# Altium PCB ARU8113 Testboard_V0.1.PcbDoc (part 3 of 3)
Units mil, origin at the board's own origin, x right, y up, seen from the top; angles counter-clockwise.
Board outline 6377.95 x 5157.48 mil, 4 copper layers (Top, PWR, GND, Bottom), stack 62.992 mil thick; 518 components, 350 nets, 1764 pads, 749 vias.
Unrouted connection lines stored in the file: 230.
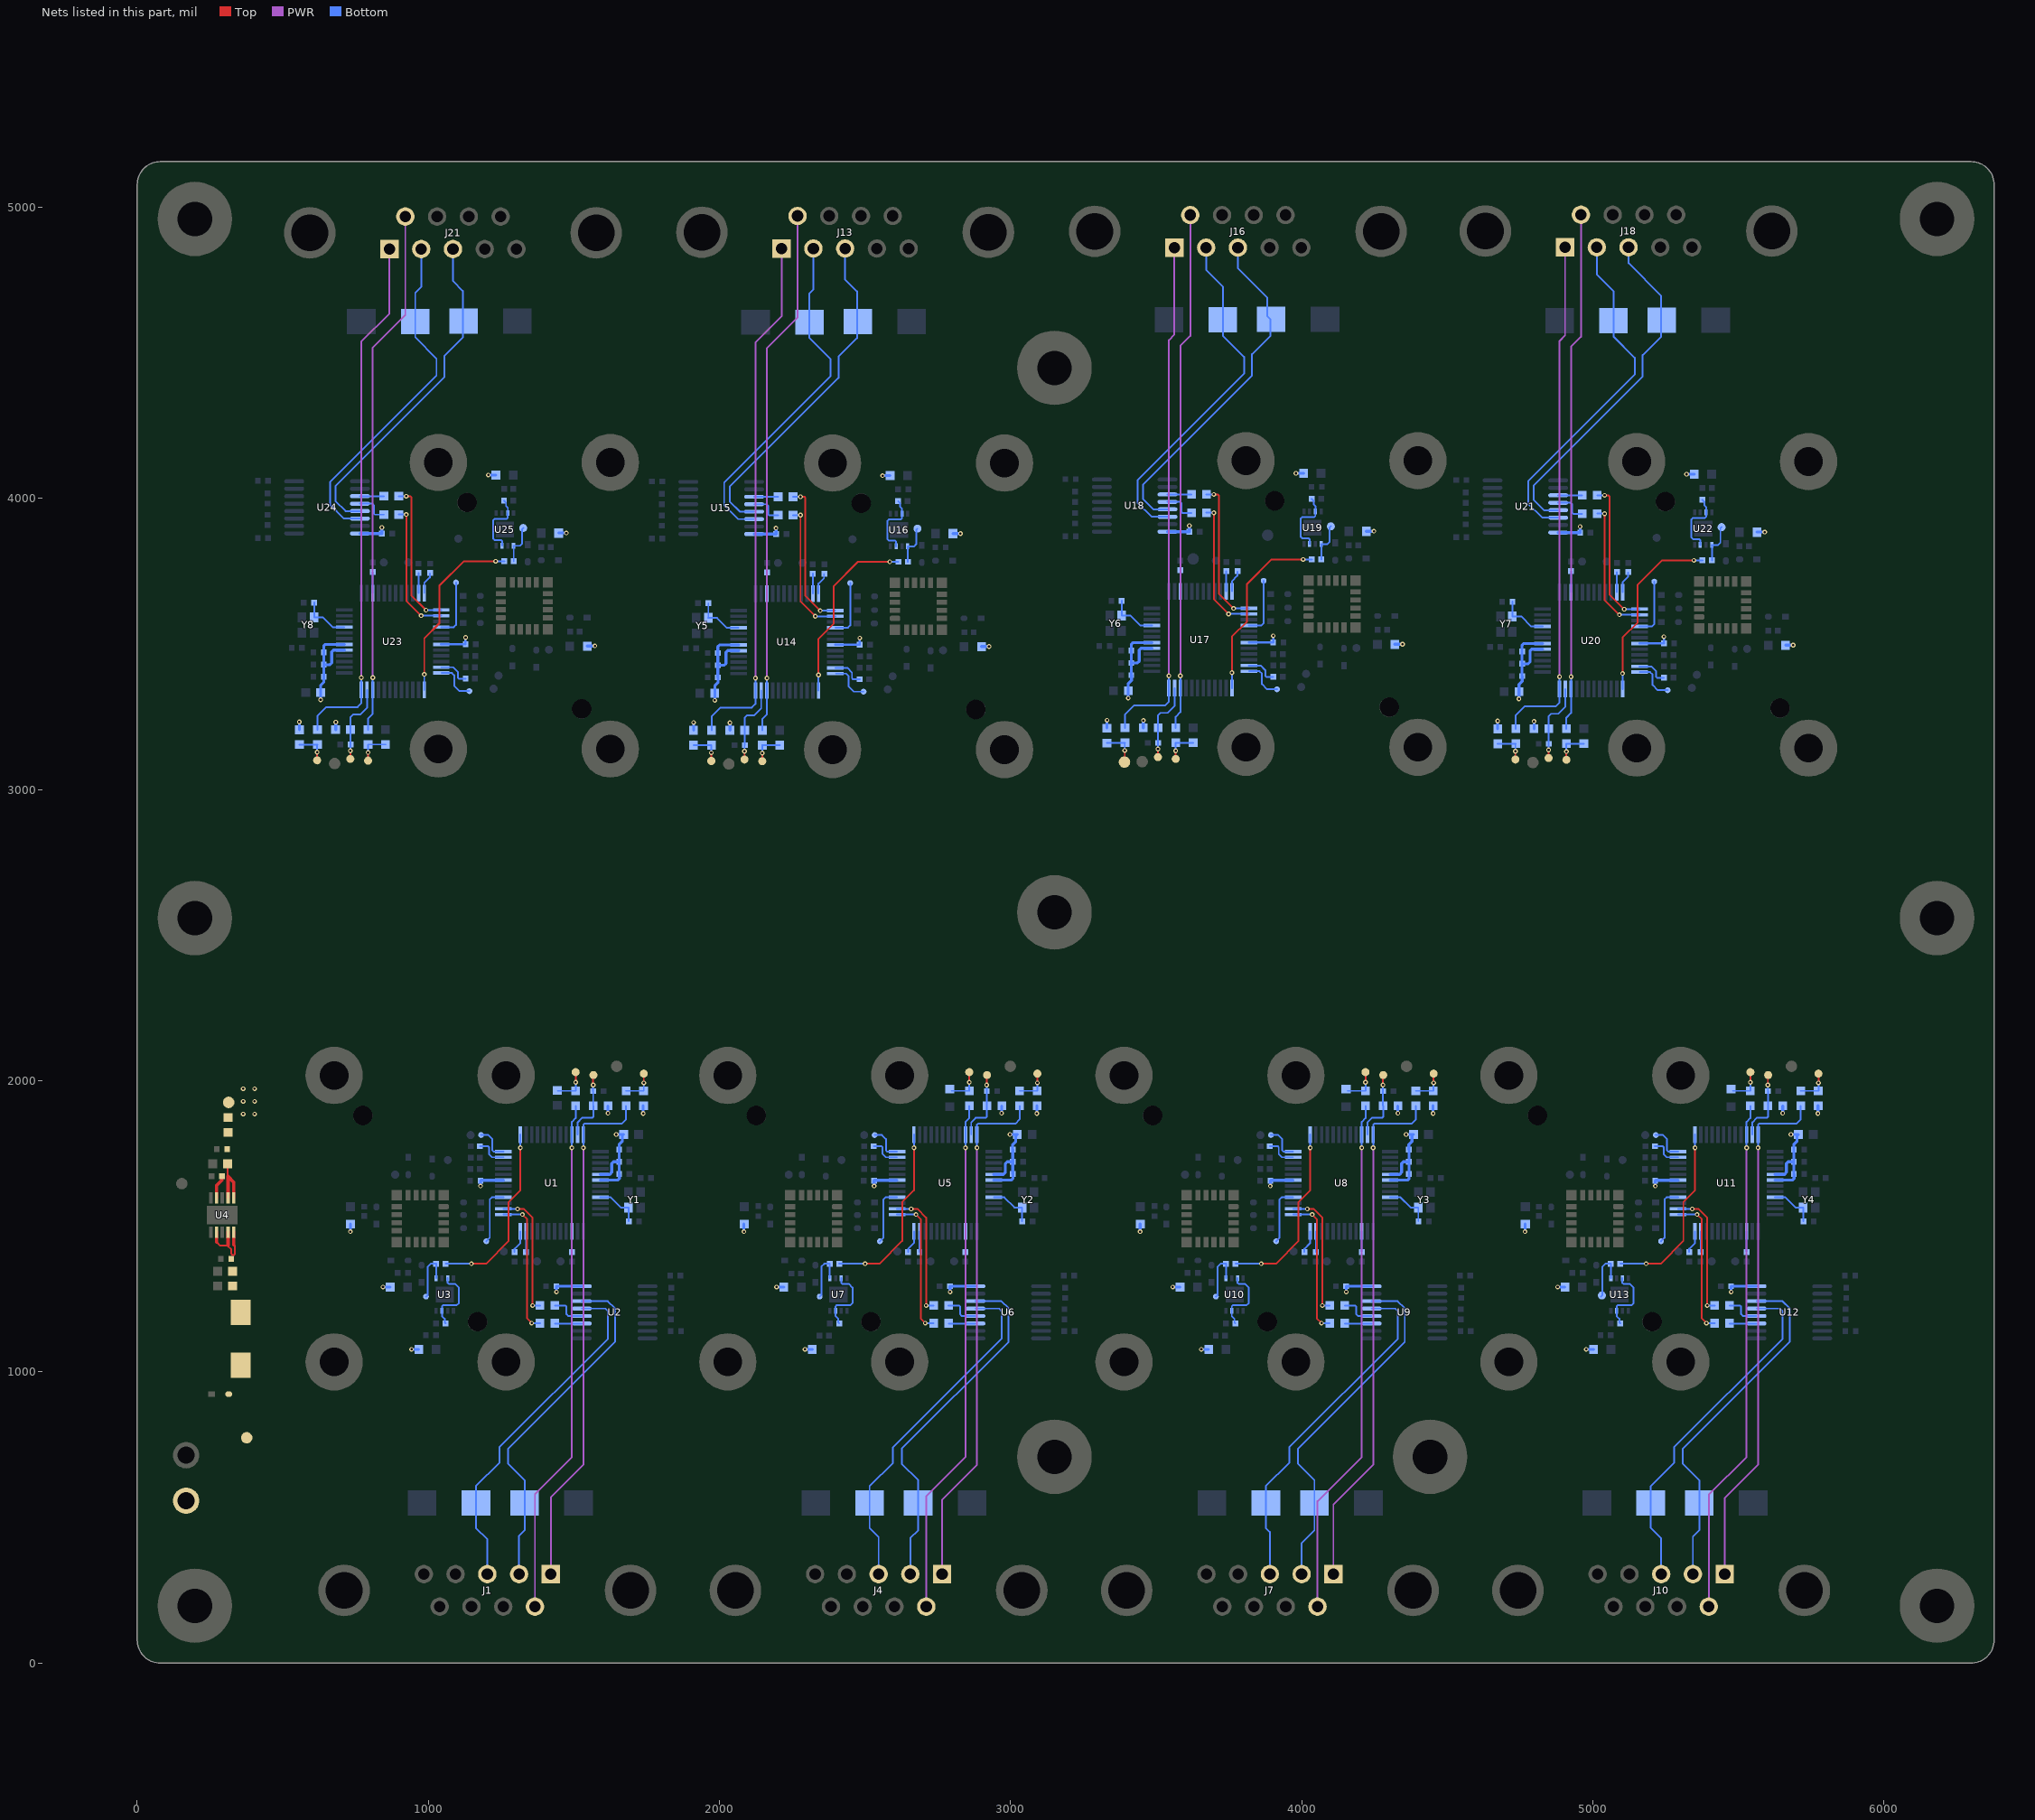
[diagram p5: the nets of this part, all layers, seen from the top]

## Via types
v1: diameter 16, hole 8, Top to Bottom, tented both sides, 749 vias

## Nets (pads, with @x,y where several pads share a name; then routed paths per layer and width w, separated by ;. In a path a pad name is that pad's centre, name@x,y a point inside that pad or via, vN(x,y) a via of type N, cw(c..) or ccw(c..) an arc to the next point about the centre after c; other vN are vias at no path point) (continued)
NetR1_1: J1.1 R1.1 U1.48 | length 1790.5
  PWR w6: J1.1@1420.65,304.91 1420.65,568.65 1532.39,680.39 v1(1532.39,1769)
  Bottom w6: v1(1532.39,1769) U1.48@1532.39,1814.44 1532.39,1848.49 1535.91,1852 1664,1852 1679,1867 R1.1@1679,1913.41
NetR2_1: J1.6 R2.1 U1.46 | length 1778.2
  PWR w6: J1.6@1366.13,193.1 1366.13,580.13 1493.02,707.02 v1(1493.02,1769)
  Bottom w6: v1(1493.02,1769) U1.46@1493.02,1814.44 1493.02,1858.02 1506,1871 R2.1@1506,1913.41
NetR15_2: R15.2 U2.11 | length 91.6
  Bottom w6: R15.2@1435.58,1165.6 U2.11@1527.2,1165.6
NetR16_2: R16.2 U2.12 | length 123
  Bottom w6: R16.2@1434.59,1227.59 1470.49,1227.59 1474,1224.08 1474,1198 1480.8,1191.2 U2.12@1527.2,1191.2
NetR19_1: J4.1 R19.1 U5.48 | length 1793.9
  PWR w6: J4.1@2764.65,304.91 2764.65,560.65 2884.39,680.39 v1(2884.39,1769)
  Bottom w6: v1(2884.39,1769) U5.48@2884.39,1814.44 2884.39,1848.49 2887.91,1852 3016,1852 3031,1867 R19.1@3031,1913.41
NetR20_1: J4.6 R20.1 U5.46 | length 1781.6
  PWR w6: J4.6@2710.13,193.1 2710.13,572.13 2845.02,707.02 v1(2845.02,1769)
  Bottom w6: v1(2845.02,1769) U5.46@2845.02,1814.44 2845.02,1858.02 2858,1871 R20.1@2858,1913.41
NetR33_2: R33.2 U6.11 | length 91.6
  Bottom w6: R33.2@2787.58,1165.6 U6.11@2879.2,1165.6
NetR34_2: R34.2 U6.12 | length 123
  Bottom w6: R34.2@2786.59,1227.59 2822.49,1227.59 2826,1224.08 2826,1198 2832.8,1191.2 U6.12@2879.2,1191.2
NetR36_1: J7.1 R36.1 U8.48 | length 1800.9
  PWR w6: J7.1@4108.65,304.91 4108.65,543.65 4245.39,680.39 v1(4245.39,1769)
  Bottom w6: v1(4245.39,1769) U8.48@4245.39,1814.44 4245.39,1848.49 4248.91,1852 4377,1852 4392,1867 R36.1@4392,1913.41
NetR37_1: J7.6 R37.1 U8.46 | length 1788.6
  PWR w6: J7.6@4054.13,193.1 4054.13,555.13 4206.02,707.02 v1(4206.02,1769)
  Bottom w6: v1(4206.02,1769) U8.46@4206.02,1814.44 4206.02,1858.02 4219,1871 R37.1@4219,1913.41
NetR50_2: R50.2 U9.11 | length 91.6
  Bottom w6: R50.2@4148.58,1165.6 U9.11@4240.2,1165.6
NetR51_2: R51.2 U9.12 | length 123
  Bottom w6: R51.2@4147.59,1227.59 4183.49,1227.59 4187,1224.08 4187,1198 4193.8,1191.2 U9.12@4240.2,1191.2
NetR53_1: J10.1 R53.1 U11.48 | length 1791.8
  PWR w6: J10.1@5452.65,304.91 5452.65,565.65 5567.39,680.39 v1(5567.39,1769)
  Bottom w6: v1(5567.39,1769) U11.48@5567.39,1814.44 5567.39,1848.49 5570.91,1852 5699,1852 5714,1867 R53.1@5714,1913.41
NetR54_1: J10.6 R54.1 U11.46 | length 1779.5
  PWR w6: J10.6@5398.13,193.1 5398.13,577.13 5528.02,707.02 v1(5528.02,1769)
  Bottom w6: v1(5528.02,1769) U11.46@5528.02,1814.44 5528.02,1858.02 5541,1871 R54.1@5541,1913.41
NetR67_2: R67.2 U12.11 | length 91.6
  Bottom w6: R67.2@5470.58,1165.6 U12.11@5562.2,1165.6
NetR68_2: R68.2 U12.12 | length 123
  Bottom w6: R68.2@5469.59,1227.59 5505.49,1227.59 5509,1224.08 5509,1198 5515.8,1191.2 U12.12@5562.2,1191.2
NetR70_1: J13.1 R70.1 U14.48 | length 1816.9
  PWR w6: v1(2123.61,3382.31) 2123.61,4535.58 2213.47,4625.44 J13.1@2213.47,4858.19
  Bottom w6: R70.1@1973.01,3203.59 1973.01,3250.01 2004,3281 2111,3281 2123.61,3293.61 U14.48@2123.61,3339.99 v1(2123.61,3382.31)
NetR71_1: J13.6 R71.1 U14.46 | length 1816.5
  PWR w6: v1(2162.98,3382.31) 2162.98,4515.98 2268,4621 J13.6@2268,4970
  Bottom w6: R71.1@2147,3203.59 2147,3241.8 2162.98,3257.77 U14.46@2162.98,3339.99 v1(2162.98,3382.31)
NetR84_2: R84.2 U15.11 | length 82.6
  Bottom w6: U15.11@2118.8,4005.4 R84.2@2201.41,4005.41
NetR85_2: R85.2 U15.12 | length 114.9
  Bottom w6: U15.12@2118.8,3979.8 2161.8,3979.8 2167,3974.6 2167,3945.51 2170.51,3942 R85.2@2201,3942
NetR87_1: J16.1 R87.1 U17.48 | length 1782.6
  PWR w6: v1(3543.61,3390.31) 3543.61,4543.58 3562.6,4562.57 J16.1@3562.6,4861.29
  Bottom w6: R87.1@3393.01,3211.59 3393.01,3258.01 3424,3289 3531,3289 3543.61,3301.61 U17.48@3543.61,3347.99 v1(3543.61,3390.31)
NetR88_1: J16.6 R88.1 U17.46 | length 1782.3
  PWR w6: v1(3582.98,3390.31) 3582.98,4523.98 3617.13,4558.13 J16.6@3617.13,4973.1
  Bottom w6: R88.1@3567,3211.59 3567,3249.8 3582.98,3265.77 U17.46@3582.98,3347.99 v1(3582.98,3390.31)
NetR101_2: R101.2 U18.11 | length 82.6
  Bottom w6: U18.11@3538.8,4013.4 R101.2@3621.41,4013.41
NetR102_2: R102.2 U18.12 | length 114.9
  Bottom w6: U18.12@3538.8,3987.8 3581.8,3987.8 3587,3982.6 3587,3953.51 3590.51,3950 R102.2@3621,3950
NetR104_1: J18.1 R104.1 U20.48 | length 1786.5
  PWR w6: v1(4885.61,3387.31) 4885.61,4540.58 4904.47,4559.44 J18.1@4904.47,4862.19
  Bottom w6: R104.1@4735.01,3208.59 4735.01,3255.01 4766,3286 4873,3286 4885.61,3298.61 U20.48@4885.61,3344.99 v1(4885.61,3387.31)
NetR105_1: J18.6 R105.1 U20.46 | length 1786.1
  PWR w6: v1(4924.98,3387.31) 4924.98,4520.98 4959,4555 J18.6@4959,4974
  Bottom w6: R105.1@4909,3208.59 4909,3246.8 4924.98,3262.77 U20.46@4924.98,3344.99 v1(4924.98,3387.31)
NetR118_2: R118.2 U21.11 | length 82.6
  Bottom w6: U21.11@4880.8,4010.4 R118.2@4963.41,4010.41
NetR119_2: R119.2 U21.12 | length 114.9
  Bottom w6: U21.12@4880.8,3984.8 4923.8,3984.8 4929,3979.6 4929,3950.51 4932.51,3947 R119.2@4963,3947
NetR121_1: J21.1 R121.1 U23.48 | length 1815.8
  PWR w6: v1(769.61,3384.31) 769.61,4537.58 866.47,4634.44 J21.1@866.47,4856.19
  Bottom w6: R121.1@619.01,3205.59 619.01,3252.01 650,3283 757,3283 769.61,3295.61 U23.48@769.61,3341.99 v1(769.61,3384.31)
NetR122_1: J21.6 R122.1 U23.46 | length 1815.4
  PWR w6: v1(808.98,3384.31) 808.98,4517.98 921,4630 J21.6@921,4968
  Bottom w6: R122.1@793,3205.59 793,3243.8 808.98,3259.77 U23.46@808.98,3341.99 v1(808.98,3384.31)
NetR135_2: R135.2 U24.11 | length 82.6
  Bottom w6: U24.11@764.8,4007.4 R135.2@847.41,4007.41
NetR136_2: R136.2 U24.12 | length 114.9
  Bottom w6: U24.12@764.8,3981.8 807.8,3981.8 813,3976.6 813,3947.51 816.51,3944 R136.2@847,3944
NetT42_1: T42.1 U11.28 | length 198.5
  Bottom w6: T42.1@5234,1448 5246,1460 5246,1591.78 5253.11,1598.89 U11.28@5292.79,1598.89
NetT90_1: T90.1 U23.28 | length 200
  Bottom w6: U23.28@1044.21,3557.54 1087.49,3557.54 1095.34,3565.39 T90.1@1095.34,3711
NetT135_1: T135.1 U1.36 | length 123.2
  Bottom w6: T135.1@1181,1813 1206,1813 1220,1799 1220,1759.88 1223.51,1756.37 U1.36@1257.79,1756.37
NetT136_1: T136.1 U5.36 | length 123.2
  Bottom w6: T136.1@2533,1813 2558,1813 2572,1799 2572,1759.88 2575.51,1756.37 U5.36@2609.79,1756.37
NetT137_1: T137.1 U8.36 | length 123.2
  Bottom w6: T137.1@3894,1813 3919,1813 3933,1799 3933,1759.88 3936.51,1756.37 U8.36@3970.79,1756.37
NetT138_1: T138.1 U11.36 | length 123.2
  Bottom w6: T138.1@5216,1813 5241,1813 5255,1799 5255,1759.88 5258.51,1756.37 U11.36@5292.79,1756.37
NetT139_1: T139.1 U14.36 | length 142.5
  Bottom w6: U14.36@2399.27,3398.06 2434.94,3398.06 2443,3390 2443,3354 2461,3336 T139.1@2495,3336
NetT140_1: T140.1 U17.36 | length 142.5
  Bottom w6: U17.36@3819.27,3406.06 3854.94,3406.06 3863,3398 3863,3362 3881,3344 T140.1@3915,3344
NetT141_1: T141.1 U20.36 | length 142.5
  Bottom w6: U20.36@5161.27,3403.06 5196.94,3403.06 5205,3395 5205,3359 5223,3341 T141.1@5257,3341
NetT142_1: T142.1 U23.36 | length 142.5
  Bottom w6: U23.36@1045.27,3400.06 1080.94,3400.06 1089,3392 1089,3356 1107,3338 T142.1@1141,3338
NMCU_RSTA1: C6.1 R4.2 T3.1 U1.47 | length 246.2
  Top w6: v1(1566,1985) T3.1@1566,2018
  Bottom w6: U1.47@1512.71,1814.44 1512.71,1856.71 1528,1872 1563.02,1872 1566.53,1875.51 R4.2@1566.53,1913.51 ; v1(1566,1985) 1566,1964.28 C6.1@1566.28,1964 R4.2@1566.28,1913.76
NMCU_RSTA2: C28.1 R22.2 T20.1 U5.47 | length 246.2
  Top w6: v1(2918,1985) T20.1@2918,2018
  Bottom w6: U5.47@2864.71,1814.44 2864.71,1856.71 2880,1872 2915.02,1872 2918.53,1875.51 R22.2@2918.53,1913.51 ; v1(2918,1985) 2918,1964.28 C28.1@2918.28,1964 R22.2@2918.28,1913.76
NMCU_RSTA3: C44.1 R39.2 T32.1 U8.47 | length 246.2
  Top w6: v1(4279,1985) T32.1@4279,2018
  Bottom w6: U8.47@4225.71,1814.44 4225.71,1856.71 4241,1872 4276.02,1872 4279.53,1875.51 R39.2@4279.53,1913.51 ; v1(4279,1985) 4279,1964.28 C44.1@4279.28,1964 R39.2@4279.28,1913.76
NMCU_RSTA4: C60.1 R56.2 T44.1 U11.47 | length 246.2
  Top w6: v1(5601,1985) T44.1@5601,2018
  Bottom w6: U11.47@5547.71,1814.44 5547.71,1856.71 5563,1872 5598.02,1872 5601.53,1875.51 R56.2@5601.53,1913.51 ; v1(5601,1985) 5601,1964.28 C60.1@5601.28,1964 R56.2@5601.28,1913.76
NMCU_RSTA5: C76.1 R73.2 T56.1 U14.47 | length 275
  Top w6: T56.1@2086,3103 v1(2086,3131)
  Bottom w6: v1(2086,3131) 2086,3151.41 C76.1@2086.59,3152 ; C76.1@2086.59,3152.41 R73.2@2086.59,3203.59 2086.59,3246.59 2095,3255 2120,3255 2143.29,3278.29 U14.47@2143.29,3339.99
NMCU_RSTA6: C92.1 R90.2 T68.1 U17.47 | length 275
  Top w6: T68.1@3506,3111 v1(3506,3139)
  Bottom w6: v1(3506,3139) 3506,3159.41 C92.1@3506.59,3160 ; C92.1@3506.59,3160.41 R90.2@3506.59,3211.59 3506.59,3254.59 3515,3263 3540,3263 3563.29,3286.29 U17.47@3563.29,3347.99
NMCU_RSTA7: C108.1 R107.2 T80.1 U20.47 | length 275
  Top w6: T80.1@4848,3108 v1(4848,3136)
  Bottom w6: v1(4848,3136) 4848,3156.41 C108.1@4848.59,3157 ; C108.1@4848.59,3157.41 R107.2@4848.59,3208.59 4848.59,3251.59 4857,3260 4882,3260 4905.29,3283.29 U20.47@4905.29,3344.99
NMCU_RSTA8: C124.1 R124.2 T92.1 U23.47 | length 275
  Top w6: T92.1@732,3105 v1(732,3133)
  Bottom w6: v1(732,3133) 732,3153.41 C124.1@732.59,3154 ; C124.1@732.59,3154.41 R124.2@732.59,3205.59 732.59,3248.59 741,3257 766,3257 789.29,3280.29 U23.47@789.29,3341.99
Server_RS232_RX1: D9.2 J1.3 U2.13 | length 1200.5
  Bottom w6: J1.3@1202.54,304.91 1202.54,424.46 1163.65,463.35 D9.2@1163.65,549.1 1163.65,606.65 1244,687 1244,740.71 1617,1113.71 1617,1208 1608.1,1216.9 U2.13@1527.2,1216.9
Server_RS232_RX3: D35.2 J7.3 U9.13 | length 1190.1
  Bottom w6: J7.3@3890.54,304.91 3890.54,449.46 3876.65,463.35 D35.2@3876.65,549.1 3876.65,606.65 3957,687 3957,740.71 4330,1113.71 4330,1208 4321.1,1216.9 U9.13@4240.2,1216.9
Server_RS232_RX4: D46.2 J10.3 U12.13 | length 1199.2
  Bottom w6: J10.3@5234.54,304.91 5234.54,427.46 5198.65,463.35 D46.2@5198.65,549.1 5198.65,606.65 5279,687 5279,740.71 5652,1113.71 5652,1208 5643.1,1216.9 U12.13@5562.2,1216.9
Server_RS232_RX5: D58.2 J13.3 U15.13 | length 1165.5
  Bottom w6: U15.13@2118.8,3954.2 2069.8,3954.2 2035,3989 2035,4040 2409,4414 2409,4487 2472.44,4550.44 2472.44,4607 2472.44,4710.56 2431.58,4751.42 J13.3@2431.58,4858.19
Server_RS232_RX6: D70.2 J16.3 U18.13 | length 1190
  Bottom w6: U18.13@3538.8,3962.2 3489.8,3962.2 3455,3997 3455,4048 3829,4422 3829,4495 3892.44,4558.44 3892.44,4615 3881.21,4626.23 3881.21,4689.79 3780.71,4790.29 J16.3@3780.71,4861.29
Server_RS232_RX7: D82.2 J18.3 U21.13 | length 1193.9
  Bottom w6: U21.13@4880.8,3959.2 4831.8,3959.2 4797,3994 4797,4045 5171,4419 5171,4492 5234.44,4555.44 5234.44,4612 5234.44,4695.56 5122.58,4807.42 J18.3@5122.58,4862.19
Server_RS232_RX8: D94.2 J21.3 U24.13 | length 1158.6
  Bottom w6: U24.13@764.8,3956.2 715.8,3956.2 681,3991 681,4042 1055,4416 1055,4489 1118.44,4552.44 1118.44,4609 1118.44,4712.56 1084.58,4746.42 J21.3@1084.58,4856.19
Server_RS232_RX_2: D23.2 J4.3 U6.13 | length 1197.2
  Bottom w6: J4.3@2546.54,304.91 2546.54,432.46 2515.65,463.35 D23.2@2515.65,549.1 2515.65,606.65 2596,687 2596,740.71 2969,1113.71 2969,1208 2960.1,1216.9 U6.13@2879.2,1216.9
Server_RS232_TX1: D8.2 J1.2 U2.14 | length 1220.2
  Bottom w6: J1.2@1311.6,304.91 1311.6,436.6 1330.61,455.61 D8.2@1330.61,549.1 1330.61,627.39 1274,684 1274,735.78 1640.82,1102.6 1640.82,1218.18 1616.5,1242.5 U2.14@1527.2,1242.5
Server_RS232_TX3: D34.2 J7.2 U9.14 | length 1230.6
  Bottom w6: J7.2@3999.6,304.91 3999.6,411.6 4043.61,455.61 D34.2@4043.61,549.1 4043.61,627.39 3987,684 3987,735.78 4353.82,1102.6 4353.82,1218.18 4329.5,1242.5 U9.14@4240.2,1242.5
Server_RS232_TX4: D45.2 J10.2 U12.14 | length 1221.5
  Bottom w6: J10.2@5343.6,304.91 5343.6,433.6 5365.61,455.61 D45.2@5365.61,549.1 5365.61,627.39 5309,684 5309,735.78 5675.82,1102.6 5675.82,1218.18 5651.5,1242.5 U12.14@5562.2,1242.5
Server_RS232_TX5: D57.2 J13.2 U15.14 | length 1191.5
  Bottom w6: U15.14@2118.8,3928.6 2064.4,3928.6 2016,3977 2016,4054 2382,4420 2382,4478 2308.93,4551.07 D57.2@2308.93,4605 2308.93,4703.93 2322.53,4717.53 J13.2@2322.53,4858.19
Server_RS232_TX6: D69.2 J16.2 U18.14 | length 1204.7
  Bottom w6: U18.14@3538.8,3936.6 3484.4,3936.6 3436,3985 3436,4062 3802,4428 3802,4486 3728.93,4559.07 D69.2@3728.93,4613 3728.93,4727.54 3671.65,4784.81 J16.2@3671.65,4861.29
Server_RS232_TX7: D81.2 J18.2 U21.14 | length 1208.7
  Bottom w6: U21.14@4880.8,3933.6 4826.4,3933.6 4778,3982 4778,4059 5144,4425 5144,4483 5070.93,4556.07 D81.2@5070.93,4610 5070.93,4712.07 5013.53,4769.47 J18.2@5013.53,4862.19
Server_RS232_TX8: D93.2 J21.2 U24.14 | length 1190.4
  Bottom w6: U24.14@764.8,3930.6 710.4,3930.6 662,3979 662,4056 1028,4422 1028,4480 954.93,4553.07 954.93,4705.93 975.53,4726.53 J21.2@975.53,4856.19
Server_RS232_TX_2: D22.2 J4.2 U6.14 | length 1223.5
  Bottom w6: J4.2@2655.6,304.91 2655.6,428.6 2682.61,455.61 D22.2@2682.61,549.1 2682.61,627.39 2626,684 2626,735.78 2992.82,1102.6 2992.82,1218.18 2968.5,1242.5 U6.14@2879.2,1242.5
Server_RXD1: R16.1 U1.26 | length 440
  Top w6: v1(1306.27,1559.13) 1327.92,1559.13 1357.82,1529.22 v1(1357.82,1227.59)
  Bottom w6: U1.26@1257.79,1559.52 1258.18,1559.13 1305.87,1559.13 v1@1306.27,1558.73 ; v1(1357.82,1227.59) R16.1@1383.41,1227.59
Server_RXD2: R34.1 U5.26 | length 440
  Top w6: v1(2658.27,1559.13) 2679.92,1559.13 2709.82,1529.22 v1(2709.82,1227.59)
  Bottom w6: U5.26@2609.79,1559.52 2610.18,1559.13 2657.87,1559.13 v1@2658.27,1558.73 ; v1(2709.82,1227.59) R34.1@2735.41,1227.59
Server_RXD3: R51.1 U8.26 | length 440
  Top w6: v1(4019.27,1559.13) 4040.92,1559.13 4070.82,1529.22 v1(4070.82,1227.59)
  Bottom w6: U8.26@3970.79,1559.52 3971.18,1559.13 4018.87,1559.13 v1@4019.27,1558.73 ; v1(4070.82,1227.59) R51.1@4096.41,1227.59
Server_RXD4: R68.1 U11.26 | length 440
  Top w6: v1(5341.27,1559.13) 5362.92,1559.13 5392.82,1529.22 v1(5392.82,1227.59)
  Bottom w6: U11.26@5292.79,1559.52 5293.18,1559.13 5340.87,1559.13 v1@5341.27,1558.73 ; v1(5392.82,1227.59) R68.1@5418.41,1227.59
Server_RXD5: R85.1 U14.26 | length 463.2
  Top w6: v1(2278.18,3942.41) 2278.18,3645.82 v1(2329,3595)
  Bottom w6: R85.1@2252.59,3942.41 v1(2278.18,3942.41) ; v1(2329,3595) U14.26@2398.17,3594.96
Server_RXD6: R102.1 U17.26 | length 463.2
  Top w6: v1(3698.18,3950.41) 3698.18,3653.82 v1(3749,3603)
  Bottom w6: R102.1@3672.59,3950.41 v1(3698.18,3950.41) ; v1(3749,3603) U17.26@3818.17,3602.96
Server_RXD7: R119.1 U20.26 | length 463.2
  Top w6: v1(5040.18,3947.41) 5040.18,3650.82 v1(5091,3600)
  Bottom w6: R119.1@5014.59,3947.41 v1(5040.18,3947.41) ; v1(5091,3600) U20.26@5160.17,3599.96
Server_RXD8: R136.1 U23.26 | length 463.2
  Top w6: v1(924.18,3944.41) 924.18,3647.82 v1(975,3597)
  Bottom w6: R136.1@898.59,3944.41 v1(924.18,3944.41) ; v1(975,3597) U23.26@1044.17,3596.96
Server_TXD1: R15.1 U1.25 | length 479.9
  Top w6: v1(1323,1540) 1339,1524 1339,1183 v1(1355,1167)
  Bottom w6: U1.25@1257.79,1539.83 1257.87,1539.92 1322.92,1539.92 v1(1323,1540) ; v1(1355,1167) R15.1@1383.41,1167
Server_TXD2: R33.1 U5.25 | length 479.9
  Top w6: v1(2675,1540) 2691,1524 2691,1183 v1(2707,1167)
  Bottom w6: U5.25@2609.79,1539.83 2609.87,1539.92 2674.92,1539.92 v1(2675,1540) ; v1(2707,1167) R33.1@2735.41,1167
Server_TXD3: R50.1 U8.25 | length 479.9
  Top w6: v1(4036,1540) 4052,1524 4052,1183 v1(4068,1167)
  Bottom w6: U8.25@3970.79,1539.83 3970.87,1539.92 4035.92,1539.92 v1(4036,1540) ; v1(4068,1167) R50.1@4096.41,1167
Server_TXD4: R67.1 U11.25 | length 479.9
  Top w6: v1(5358,1540) 5374,1524 5374,1183 v1(5390,1167)
  Bottom w6: U11.25@5292.79,1539.83 5292.87,1539.92 5357.92,1539.92 v1(5358,1540) ; v1(5390,1167) R67.1@5418.41,1167
Server_TXD5: R84.1 U14.25 | length 504.6
  Top w6: v1(2278.18,4005.41) 2291.67,4005.41 2295.18,4001.9 2295.18,3664.82 v1(2346,3614)
  Bottom w6: R84.1@2252.59,4005.41 v1(2278.18,4005.41) ; v1(2346,3614) U14.25@2397.61,3614
Server_TXD6: R101.1 U17.25 | length 504.6
  Top w6: v1(3698.18,4013.41) 3711.67,4013.41 3715.18,4009.9 3715.18,3672.82 v1(3766,3622)
  Bottom w6: R101.1@3672.59,4013.41 v1(3698.18,4013.41) ; v1(3766,3622) U17.25@3817.61,3622
Server_TXD7: R118.1 U20.25 | length 504.6
  Top w6: v1(5040.18,4010.41) 5053.67,4010.41 5057.18,4006.9 5057.18,3669.82 v1(5108,3619)
  Bottom w6: R118.1@5014.59,4010.41 v1(5040.18,4010.41) ; v1(5108,3619) U20.25@5159.61,3619
Server_TXD8: R135.1 U23.25 | length 504.6
  Top w6: v1(924.18,4007.41) 937.67,4007.41 941.18,4003.9 941.18,3666.82 v1(992,3616)
  Bottom w6: R135.1@898.59,4007.41 v1(924.18,4007.41) ; v1(992,3616) U23.25@1043.61,3616
SPI_CS3_1: R14.2 T12.1 U3.1 | length 187.8
  Bottom w6: T12.1@992,1258 997.91,1263.91 997.91,1360.71 1008.2,1371 R14.2@1026.86,1371 U3.1@1026.86,1321.54
SPI_CS3_2: R32.2 T29.1 U7.1 | length 187.8
  Bottom w6: T29.1@2344,1258 2349.91,1263.91 2349.91,1360.71 2360.2,1371 R32.2@2378.86,1371 U7.1@2378.86,1321.54
SPI_CS3_3: R49.2 T41.1 U10.1 | length 187.8
  Bottom w6: T41.1@3705,1258 3710.91,1263.91 3710.91,1360.71 3721.2,1371 R49.2@3739.86,1371 U10.1@3739.86,1321.54
SPI_CS3_4: R66.2 T53.1 U13.1 | length 187.8
  Bottom w6: T53.1@5027,1258 5032.91,1263.91 5032.91,1360.71 5043.2,1371 R66.2@5061.86,1371 U13.1@5061.86,1321.54
SPI_CS3_5: R83.2 T65.1 U16.1 | length 140.9
  Bottom w6: U16.1@2646.4,3835 U16.1@2647.14,3835 ; R83.2@2647.14,3782 U16.1@2647.14,3835 ; T65.1@2680,3896 2676.16,3892.16 2676.16,3842.63 2668.53,3835 U16.1@2647.14,3835
SPI_CS3_6: R100.2 T77.1 U19.1 | length 140.9
  Bottom w6: U19.1@4066.4,3843 U19.1@4067.14,3843 ; R100.2@4067.14,3790 U19.1@4067.14,3843 ; T77.1@4100,3904 4096.16,3900.16 4096.16,3850.63 4088.53,3843 U19.1@4067.14,3843
SPI_CS3_7: R117.2 T89.1 U22.1 | length 140.9
  Bottom w6: U22.1@5408.4,3840 U22.1@5409.14,3840 ; R117.2@5409.14,3787 U22.1@5409.14,3840 ; T89.1@5442,3901 5438.16,3897.16 5438.16,3847.63 5430.53,3840 U22.1@5409.14,3840
SPI_CS3_8: R134.2 T101.1 U25.1 | length 140.9
  Bottom w6: U25.1@1292.4,3837 U25.1@1293.14,3837 ; R134.2@1293.14,3784 U25.1@1293.14,3837 ; T101.1@1326,3898 1322.16,3894.16 1322.16,3844.63 1314.53,3837 U25.1@1293.14,3837
SPIA_CS1_IMU1: R12.1 U1.35 | length 109.5
  Bottom w6: R12.1@1177.58,1774.65 1204.49,1774.65 1208,1771.14 1208,1748 1219.31,1736.69 U1.35@1257.79,1736.69
SPIA_CS1_IMU2: R30.1 U5.35 | length 109.5
  Bottom w6: R30.1@2529.58,1774.65 2556.49,1774.65 2560,1771.14 2560,1748 2571.31,1736.69 U5.35@2609.79,1736.69
SPIA_CS1_IMU3: R47.1 U8.35 | length 109.5
  Bottom w6: R47.1@3890.58,1774.65 3917.49,1774.65 3921,1771.14 3921,1748 3932.31,1736.69 U8.35@3970.79,1736.69
SPIA_CS1_IMU4: R64.1 U11.35 | length 109.5
  Bottom w6: R64.1@5212.58,1774.65 5239.49,1774.65 5243,1771.14 5243,1748 5254.31,1736.69 U11.35@5292.79,1736.69
SPIA_CS1_IMU5: R81.1 U14.35 | length 111.4
  Bottom w6: U14.35@2398.21,3417.75 2438.93,3417.75 2455,3401.68 2455,3382.17 2458.51,3378.65 R81.1@2482,3378.65
SPIA_CS1_IMU6: R98.1 U17.35 | length 111.4
  Bottom w6: U17.35@3818.21,3425.75 3858.93,3425.75 3875,3409.68 3875,3390.17 3878.51,3386.65 R98.1@3902,3386.65
SPIA_CS1_IMU7: R115.1 U20.35 | length 111.4
  Bottom w6: U20.35@5160.21,3422.75 5200.93,3422.75 5217,3406.68 5217,3387.17 5220.51,3383.65 R115.1@5244,3383.65
SPIA_CS1_IMU8: R132.1 U23.35 | length 111.4
  Bottom w6: U23.35@1044.21,3419.75 1084.93,3419.75 1101,3403.68 1101,3384.17 1104.51,3380.65 R132.1@1128,3380.65
SPIA_CS3_IMU1: R14.1 U1.37 | length 631.2
  Top w6: v1(1148,1371) 1198,1371 1276,1449 1276,1583.13 1316,1623.13 v1(1316,1769)
  Bottom w6: R14.1@1059.14,1371 v1(1148,1371) ; U1.37@1315.86,1814.44 1316,1814.3 v1(1316,1769)
SPIA_CS3_IMU2: R32.1 U5.37 | length 631.2
  Top w6: v1(2500,1371) 2550,1371 2628,1449 2628,1583.13 2668,1623.13 v1(2668,1769)
  Bottom w6: R32.1@2411.14,1371 v1(2500,1371) ; U5.37@2667.86,1814.44 2668,1814.3 v1(2668,1769)
SPIA_CS3_IMU3: R49.1 U8.37 | length 631.2
  Top w6: v1(3861,1371) 3911,1371 3989,1449 3989,1583.13 4029,1623.13 v1(4029,1769)
  Bottom w6: R49.1@3772.14,1371 v1(3861,1371) ; U8.37@4028.86,1814.44 4029,1814.3 v1(4029,1769)
SPIA_CS3_IMU4: R66.1 U11.37 | length 631.2
  Top w6: v1(5183,1371) 5233,1371 5311,1449 5311,1583.13 5351,1623.13 v1(5351,1769)
  Bottom w6: R66.1@5094.14,1371 v1(5183,1371) ; U11.37@5350.86,1814.44 5351,1814.3 v1(5351,1769)
SPIA_CS3_IMU5: R83.1 U14.37 | length 637.1
  Top w6: v1(2340.14,3393.3) 2340.14,3517.16 2392,3569.01 2392,3698 2476,3782 v1(2585,3782)
  Bottom w6: U14.37@2340.14,3339.99 v1(2340.14,3393.3) ; v1(2585,3782) R83.1@2614.86,3782
SPIA_CS3_IMU6: R100.1 U17.37 | length 637.1
  Top w6: v1(3760.14,3401.3) 3760.14,3525.16 3812,3577.01 3812,3706 3896,3790 v1(4005,3790)
  Bottom w6: U17.37@3760.14,3347.99 v1(3760.14,3401.3) ; v1(4005,3790) R100.1@4034.86,3790
SPIA_CS3_IMU7: R117.1 U20.37 | length 637.1
  Top w6: v1(5102.14,3398.3) 5102.14,3522.16 5154,3574.01 5154,3703 5238,3787 v1(5347,3787)
  Bottom w6: U20.37@5102.14,3344.99 v1(5102.14,3398.3) ; v1(5347,3787) R117.1@5376.86,3787
SPIA_CS3_IMU8: R134.1 U23.37 | length 637.1
  Top w6: v1(986.14,3395.3) 986.14,3519.16 1038,3571.01 1038,3700 1122,3784 v1(1231,3784)
  Bottom w6: U23.37@986.14,3341.99 v1(986.14,3395.3) ; v1(1231,3784) R134.1@1260.86,3784
SPIA_DIN_IMU1: R10.1 U1.15 | length 70.8
  Bottom w6: R10.1@1493,1411 U1.15@1493.02,1481.76
SPIA_DIN_IMU2: R28.1 U5.15 | length 70.8
  Bottom w6: R28.1@2845,1411 U5.15@2845.02,1481.76
SPIA_DIN_IMU3: R45.1 U8.15 | length 70.8
  Bottom w6: R45.1@4206,1411 U8.15@4206.02,1481.76
SPIA_DIN_IMU4: R62.1 U11.15 | length 70.8
  Bottom w6: R62.1@5528,1411 U11.15@5528.02,1481.76
SPIA_DIN_IMU5: R79.1 U14.15 | length 72.8
  Bottom w6: U14.15@2162.98,3672.67 R79.1@2163,3745.51
SPIA_DIN_IMU6: R96.1 U17.15 | length 72.8
  Bottom w6: U17.15@3582.98,3680.67 R96.1@3583,3753.51
SPIA_DIN_IMU7: R113.1 U20.15 | length 72.8
  Bottom w6: U20.15@4924.98,3677.67 R113.1@4925,3750.51
SPIA_DIN_IMU8: R130.1 U23.15 | length 72.8
  Bottom w6: U23.15@808.98,3674.67 R130.1@809,3747.51
SPIA_DOUT_IMU1: R11.1 U1.23 | length 70.8
  Bottom w6: R11.1@1335.54,1411 U1.23@1335.54,1481.76
SPIA_DOUT_IMU2: R29.1 U5.23 | length 70.8
  Bottom w6: R29.1@2687.54,1411 U5.23@2687.54,1481.76
SPIA_DOUT_IMU3: R46.1 U8.23 | length 70.8
  Bottom w6: R46.1@4048.54,1411 U8.23@4048.54,1481.76
SPIA_DOUT_IMU4: R63.1 U11.23 | length 70.8
  Bottom w6: R63.1@5370.54,1411 U11.23@5370.54,1481.76
SPIA_DOUT_IMU5: R80.1 U14.23 | length 68.8
  Bottom w6: U14.23@2320.46,3672.67 R80.1@2320.45,3741.51
SPIA_DOUT_IMU6: R97.1 U17.23 | length 68.8
  Bottom w6: U17.23@3740.46,3680.67 R97.1@3740.45,3749.51
SPIA_DOUT_IMU7: R114.1 U20.23 | length 68.8
  Bottom w6: U20.23@5082.46,3677.67 R114.1@5082.45,3746.51
SPIA_DOUT_IMU8: R131.1 U23.23 | length 68.8
  Bottom w6: U23.23@966.46,3674.67 R131.1@966.45,3743.51
SPIA_SCK_IMU1: R9.1 U1.24 | length 79
  Bottom w6: R9.1@1296,1411 1296,1422.36 1315.86,1442.21 U1.24@1315.86,1481.76
SPIA_SCK_IMU2: R27.1 U5.24 | length 79
  Bottom w6: R27.1@2648,1411 2648,1422.36 2667.86,1442.21 U5.24@2667.86,1481.76
SPIA_SCK_IMU3: R44.1 U8.24 | length 79
  Bottom w6: R44.1@4009,1411 4009,1422.36 4028.86,1442.21 U8.24@4028.86,1481.76
SPIA_SCK_IMU4: R61.1 U11.24 | length 79
  Bottom w6: R61.1@5331,1411 5331,1422.36 5350.86,1442.21 U11.24@5350.86,1481.76
SPIA_SCK_IMU5: R78.1 U14.24 | length 75.2
  Bottom w6: U14.24@2340.14,3672.67 2340.14,3707.14 2358.99,3725.99 R78.1@2358.99,3740.05
SPIA_SCK_IMU6: R95.1 U17.24 | length 75.2
  Bottom w6: U17.24@3760.14,3680.67 3760.14,3715.14 3778.99,3733.99 R95.1@3778.99,3748.05
SPIA_SCK_IMU7: R112.1 U20.24 | length 75.2
  Bottom w6: U20.24@5102.14,3677.67 5102.14,3712.14 5120.99,3730.99 R112.1@5120.99,3745.05
SPIA_SCK_IMU8: R129.1 U23.24 | length 75.2
  Bottom w6: U23.24@986.14,3674.67 986.14,3709.14 1004.99,3727.99 R129.1@1004.99,3742.05
SWD_CLKA1: R2.2 R7.2 T7.1 | length 125.4
  Top w6: v1(1506,1994) T7.1@1506,2029
  Bottom w6: R7.2@1445,1964.59 R2.2@1506,1964.59 v1(1506,1994)
SWD_CLKA2: R20.2 R26.2 T24.1 | length 125.4
  Top w6: v1(2858,1994) T24.1@2858,2029
  Bottom w6: R26.2@2797,1964.59 R20.2@2858,1964.59 v1(2858,1994)
SWD_CLKA3: R37.2 R43.2 T36.1 | length 125.4
  Top w6: v1(4219,1994) T36.1@4219,2029
  Bottom w6: R43.2@4158,1964.59 R37.2@4219,1964.59 v1(4219,1994)
SWD_CLKA4: R54.2 R60.2 T48.1 | length 125.4
  Top w6: v1(5541,1994) T48.1@5541,2029
  Bottom w6: R60.2@5480,1964.59 R54.2@5541,1964.59 v1(5541,1994)
SWD_CLKA5: R71.2 R77.2 T60.1 | length 115.4
  Top w6: T60.1@2147,3097 v1(2147,3125)
  Bottom w6: v1(2147,3125) R71.2@2147,3152.41 ; R71.2@2147,3152.41 R77.2@2207.01,3152.41
SWD_CLKA6: R88.2 R94.2 T72.1 | length 115.4
  Top w6: T72.1@3567,3105 v1(3567,3133)
  Bottom w6: v1(3567,3133) R88.2@3567,3160.41 ; R88.2@3567,3160.41 R94.2@3627.01,3160.41
SWD_CLKA7: R105.2 R111.2 T84.1 | length 115.4
  Top w6: T84.1@4909,3102 v1(4909,3130)
  Bottom w6: v1(4909,3130) R105.2@4909,3157.41 ; R105.2@4909,3157.41 R111.2@4969.01,3157.41
SWD_CLKA8: R122.2 R128.2 T96.1 | length 115.4
  Top w6: T96.1@793,3099 v1(793,3127)
  Bottom w6: v1(793,3127) R122.2@793,3154.41 ; R122.2@793,3154.41 R128.2@853.01,3154.41
SWD_DIOA1: R1.2 R5.2 T4.1 | length 119.8
  Top w6: v1(1740,1992) T4.1@1740,2024
  Bottom w6: R1.2@1679,1964.59 R5.2@1739,1964.59 1740,1965.59 v1(1740,1992)
SWD_DIOA2: R19.2 R23.2 T21.1 | length 119.8
  Top w6: v1(3092,1992) T21.1@3092,2024
  Bottom w6: R19.2@3031,1964.59 R23.2@3091,1964.59 3092,1965.59 v1(3092,1992)
SWD_DIOA3: R36.2 R40.2 T33.1 | length 119.8
  Top w6: v1(4453,1992) T33.1@4453,2024
  Bottom w6: R36.2@4392,1964.59 R40.2@4452,1964.59 4453,1965.59 v1(4453,1992)
SWD_DIOA4: R53.2 R58.2 T45.1 | length 119.8
  Top w6: v1(5775,1992) T45.1@5775,2024
  Bottom w6: R53.2@5714,1964.59 R58.2@5774,1964.59 5775,1965.59 v1(5775,1992)
SWD_DIOA5: R70.2 R74.2 T57.1 | length 115
  Top w6: T57.1@1972,3098 v1(1972,3126)
  Bottom w6: R74.2@1911.01,3152 R70.2@1972.6,3152 ; v1(1972,3126) R70.2@1972,3151.4
SWD_DIOA6: R87.2 R92.2 T69.1 | length 127.4
  Top w6: T69.1@3391,3094 3392,3095 v1(3392,3134)
  Bottom w6: R92.2@3331.01,3160 R87.2@3392.6,3160 ; v1(3392,3134) R87.2@3392,3159.4
SWD_DIOA7: R104.2 R108.2 T81.1 | length 115
  Top w6: T81.1@4734,3103 v1(4734,3131)
  Bottom w6: R108.2@4673.01,3157 R104.2@4734.6,3157 ; v1(4734,3131) R104.2@4734,3156.4
SWD_DIOA8: R121.2 R125.2 T93.1 | length 115
  Top w6: T93.1@618,3100 v1(618,3128)
  Bottom w6: R125.2@557.01,3154 R121.2@618.6,3154 ; v1(618,3128) R121.2@618,3153.4
SYNC1: T1.1 U1.28 | length 198.5
  Bottom w6: T1.1@1199,1448 1211,1460 1211,1591.78 1218.11,1598.89 U1.28@1257.79,1598.89
SYNC2: T18.1 U5.28 | length 198.5
  Bottom w6: T18.1@2551,1448 2563,1460 2563,1591.78 2570.11,1598.89 U5.28@2609.79,1598.89
SYNC3: T30.1 U8.28 | length 198.5
  Bottom w6: T30.1@3912,1448 3924,1460 3924,1591.78 3931.11,1598.89 U8.28@3970.79,1598.89
SYNC5: T54.1 U14.28 | length 200
  Bottom w6: U14.28@2398.21,3555.54 2441.49,3555.54 2449.34,3563.39 T54.1@2449.34,3709
SYNC6: T66.1 U17.28 | length 200
  Bottom w6: U17.28@3818.21,3563.54 3861.49,3563.54 3869.34,3571.39 T66.1@3869.34,3717
SYNC7: T78.1 U20.28 | length 200
  Bottom w6: U20.28@5160.21,3560.54 5203.49,3560.54 5211.34,3568.39 T78.1@5211.34,3714
VCC3V3: C1.1 C2.2 C3.1 C4.1 C5.1 C11.1 C23.1 C24.2 C25.1 C26.1 C27.1 C33.1 C39.1 C40.2 C41.1 C42.1 C43.1 C49.1 C55.1 C56.2 C57.1 C58.1 C59.1 C65.1 C71.1 C72.2 C73.1 C74.1 C75.1 C81.1 C87.1 C88.2 C89.1 C90.1 C91.1 C97.1 C103.1 C104.2 C105.1 C106.1 C107.1 C113.1 C119.1 C120.2 C121.1 C122.1 C123.1 C129.1 L1.2 L2.1 L3.1 L4.2 L5.1 L6.1 L7.2 L8.1 L9.1 L10.2 L11.1 L12.1 L13.1 L14.2 L15.1 L16.1 L17.2 L18.1 L19.1 L20.2 L21.1 L22.1 L23.2 L24.1 R4.1 R5.1 R18.1 R22.1 R23.1 R39.1 R40.1 R56.1 R58.1 R73.1 R74.1 R90.1 R92.1 R107.1 R108.1 R124.1 R125.1 T14.1 U1.5 U1.6 U1.31 U2.16 U5.5 U5.6 U5.31 U6.16 U8.5 U8.6 U8.31 U9.16 U11.5 U11.6 U11.31 U12.16 U14.5 U14.6 U14.31 U15.16 U17.5 U17.6 U17.31 U18.16 U20.5 U20.6 U20.31 U21.16 U23.5 U23.6 U23.31 U24.16 | length 5553
  Bottom w7.87: U23.31@1044.21,3498.74 C123.1@1127.61,3498.74 ; C123.1@1127.93,3499.06 v1@1127.93,3521.93 ; C11.1@1439.92,1293.8 U2.16@1527.2,1293.8 ; U14.31@2398.21,3496.74 C75.1@2481.61,3496.74 ; C75.1@2481.93,3497.06 v1@2481.93,3519.93 ; C33.1@2791.92,1293.8 U6.16@2879.2,1293.8 ; U17.31@3818.21,3504.74 C91.1@3901.61,3504.74 ; C91.1@3901.93,3505.06 v1@3901.93,3527.93 ; C49.1@4152.92,1293.8 U9.16@4240.2,1293.8 ; U20.31@5160.21,3501.74 C107.1@5243.61,3501.74 ; C107.1@5243.93,3502.06 v1@5243.93,3524.93 ; C65.1@5474.92,1293.8 U12.16@5562.2,1293.8
  Bottom w10: R125.1@557.01,3205.18 v1(557,3232) ; v1(630,3308) 630,3357.71 641,3368.71 C120.2@641,3386.43 ; C120.2@640.71,3386.72 C121.1@640.72,3428.71 ; R124.1@682,3205.59 v1(682,3231.18) ; U23.5@711.54,3479 674,3479 668,3473 668,3434.57 662.14,3428.71 C121.1@640.72,3428.71 ; U23.6@711.54,3498.49 646.57,3498.49 640.72,3492.63 C122.1@640.72,3470.71 C121.1@640.72,3428.71 ; v1(732,1481) L3.1@732,1506.85 ; U24.16@765,3879.2 C129.1@840.28,3879.2 ; C129.1@840.14,3878.86 v1@840.14,3899.57 ; v1(844,1291) L2.1@869.08,1291 ; v1(942,1077) L1.2@967.08,1077 ; v1@1179.17,1637.95 C5.1@1179.17,1655.64 ; C5.1@1180.87,1657.37 U1.31@1257.22,1657.37 ; v1(1206,4080) L23.2@1232.08,4080 ; v1@1439.86,1274.14 C11.1@1439.86,1293.86 ; L22.1@1447.97,3881 v1(1474,3881) ; L24.1@1545.92,3493 v1(1572,3493) ; U1.6@1590.46,1657.94 1650.14,1657.94 1656,1663.8 C4.1@1656,1678.28 ; U1.5@1590.46,1678 1623.14,1678 1630.01,1684.87 1630.01,1715.14 1635.87,1721 C3.1@1655.28,1721 ; v1(1617,1887.92) R4.1@1617,1912.8 ; v1(1645.41,1815) C1.1@1671,1815 1665.86,1809.86 1665.86,1790.86 1655,1780 C2.2@1655,1763.28 ; C4.1@1655.28,1679 C3.1@1655.28,1721 ; C2.2@1655.29,1763 C3.1@1655.28,1721 ; v1(1738,1887) R5.1@1738,1913.41 ; R74.1@1911.01,3203.18 v1(1911,3230) ; v1(1984,3306) 1984,3355.71 1995,3366.71 C72.2@1995,3384.43 ; C72.2@1994.71,3384.72 C73.1@1994.72,3426.71 ; R73.1@2036,3203.59 v1(2036,3229.18) ; U14.5@2065.54,3477 2028,3477 2022,3471 2022,3432.57 2016.14,3426.71 C73.1@1994.72,3426.71 ; U14.6@2065.54,3496.49 2000.57,3496.49 1994.72,3490.63 C74.1@1994.72,3468.71 C73.1@1994.72,3426.71 ; v1(2084,1481) L6.1@2084,1506.85 ; U15.16@2119,3877.2 C81.1@2194.28,3877.2 ; C81.1@2194.14,3876.86 v1@2194.14,3897.57 ; v1(2196,1291) L5.1@2221.08,1291 ; v1(2294,1077) L4.2@2319.08,1077 ; v1@2531.17,1637.95 C27.1@2531.17,1655.64 ; C27.1@2532.87,1657.37 U5.31@2609.22,1657.37 ; v1(2560,4078) L14.2@2586.08,4078 ; v1@2791.86,1274.14 C33.1@2791.86,1293.86 ; L13.1@2801.97,3879 v1(2828,3879) ; L15.1@2899.92,3491 v1(2926,3491) ; U5.6@2942.46,1657.94 3002.14,1657.94 3008,1663.8 C26.1@3008,1678.28 ; U5.5@2942.46,1678 2975.14,1678 2982.01,1684.87 2982.01,1715.14 2987.87,1721 C25.1@3007.28,1721 ; v1(2969,1887.92) R22.1@2969,1912.8 ; v1(2997.41,1815) C23.1@3023,1815 3017.86,1809.86 3017.86,1790.86 3007,1780 C24.2@3007,1763.28 ; C26.1@3007.28,1679 C25.1@3007.28,1721 ; C24.2@3007.29,1763 C25.1@3007.28,1721 ; v1(3090,1887) R23.1@3090,1913.41 ; R92.1@3331,3211.19 v1(3331,3238) ; v1(3404,3314) 3404,3363.71 3415,3374.71 C88.2@3415,3392.43 ; C88.2@3414.71,3392.72 C89.1@3414.72,3434.71 ; v1(3445,1481) L9.1@3445,1506.85 ; R90.1@3456,3211.59 v1(3456,3237.18) ; U17.5@3485.54,3485 3448,3485 3442,3479 3442,3440.57 3436.14,3434.71 C89.1@3414.72,3434.71 ; U17.6@3485.54,3504.49 3420.57,3504.49 3414.72,3498.63 C90.1@3414.72,3476.71 C89.1@3414.72,3434.71 ; U18.16@3539,3885.2 C97.1@3614.28,3885.2 ; v1(3557,1291) L8.1@3582.08,1291 ; C97.1@3614.14,3884.86 v1@3614.14,3905.57 ; v1(3655,1077) L7.2@3680.08,1077 ; v1@3892.17,1637.95 C43.1@3892.17,1655.64 ; C43.1@3893.87,1657.37 U8.31@3970.22,1657.37 ; v1(3980,4086) L17.2@4006.08,4086 ; v1@4152.86,1274.14 C49.1@4152.86,1293.86 ; L16.1@4221.97,3887 v1(4248,3887) ; U8.6@4303.46,1657.94 4363.14,1657.94 4369,1663.8 C42.1@4369,1678.28 ; U8.5@4303.46,1678 4336.14,1678 4343.01,1684.87 4343.01,1715.14 4348.87,1721 C41.1@4368.28,1721 ; L18.1@4319.92,3499 v1(4346,3499) ; v1(4330,1887.92) R39.1@4330,1912.8 ; v1(4358.41,1815) C39.1@4384,1815 4378.86,1809.86 4378.86,1790.86 4368,1780 C40.2@4368,1763.28 ; C42.1@4368.28,1679 C41.1@4368.28,1721 ; C40.2@4368.29,1763 C41.1@4368.28,1721 ; v1(4451,1887) R40.1@4451,1913.41 ; R108.1@4673.01,3208.18 v1(4673,3235) ; v1(4746,3311) 4746,3360.71 4757,3371.71 C104.2@4757,3389.43 ; C104.2@4756.71,3389.72 C105.1@4756.72,3431.71 ; v1(4767,1481) L12.1@4767,1506.85 ; R107.1@4798,3208.59 v1(4798,3234.18) ; U20.5@4827.54,3482 4790,3482 4784,3476 4784,3437.57 4778.14,3431.71 C105.1@4756.72,3431.71 ; U20.6@4827.54,3501.49 4762.57,3501.49 4756.72,3495.63 C106.1@4756.72,3473.71 C105.1@4756.72,3431.71 ; v1(4879,1291) L11.1@4904.08,1291 ; U21.16@4881,3882.2 C113.1@4956.28,3882.2 ; C113.1@4956.14,3881.86 v1@4956.14,3902.57 ; v1(4977,1077) L10.2@5002.08,1077 ; v1@5214.17,1637.95 C59.1@5214.17,1655.64 ; C59.1@5215.87,1657.37 U11.31@5292.22,1657.37 ; v1(5322,4083) L20.2@5348.08,4083 ; v1@5474.86,1274.14 C65.1@5474.86,1293.86 ; L19.1@5563.97,3884 v1(5590,3884) ; U11.6@5625.46,1657.94 5685.14,1657.94 5691,1663.8 C58.1@5691,1678.28 ; U11.5@5625.46,1678 5658.14,1678 5665.01,1684.87 5665.01,1715.14 5670.87,1721 C57.1@5690.28,1721 ; v1(5652,1887.92) R56.1@5652,1912.8 ; L21.1@5661.92,3496 v1(5688,3496) ; v1(5680.41,1815) C55.1@5706,1815 5700.86,1809.86 5700.86,1790.86 5690,1780 C56.2@5690,1763.28 ; C58.1@5690.28,1679 C57.1@5690.28,1721 ; C56.2@5690.29,1763 C57.1@5690.28,1721 ; v1(5773,1887) R58.1@5773,1913.41
  other v1: 1440,1274 2792,1274 4153,1274 5475,1274 1179.18,1637.94 2531.18,1637.94 3892.18,1637.94 5214.18,1637.94 364.13,1885.1 403.13,1885.1 364.13,1928.6 403.13,1928.6 364.13,1972.1 403.13,1972.1 2482,3520 1128,3522 5244,3525 3902,3528 2194,3898 840,3900 4956,3903 3614,3906
VCC3V3_LDO: C20.1 C21.1 C22.1 R18.2 U4.1 U4.2 U4.4 | length 280.4
  Top w6: C20.1@310.72,1714.11 310.72,1671.51 311.81,1670.42
  Top w11.81: U4.4@272.44,1597.16 272.44,1639.42 290.84,1657.82 C22.1@290.84,1671.1 ; U4.2@311.81,1597.16 311.81,1670.42 331.5,1650.73 U4.1@331.5,1597.16
VCC5V: C17.1 C18.1 C19.1 D13.2 U4.7 U4.9 U4.10 | length 248.5
  Top w6: 272.44,1445.79 285.13,1433.1 310.13,1433.1 ; 311.81,1434.79 310.13,1433.1 ; 331.5,1436.73 335.13,1433.1 335.13,1403.39 332.48,1400.74 327.2,1400.74 323,1404.94 323,1420.23 310.13,1433.1
  Top w11.81: 272.44,1445.79 U4.7@272.44,1479.05 ; 311.81,1434.79 U4.9@311.81,1479.05 ; 331.5,1436.73 U4.10@331.5,1479.05
VCC5V_EXT: D13.1 D14.2 DC1.1 T13.1
VCC_1: R17.2 U3.3 U3.7 | length 240.8
  Bottom w6: R17.2@1059.14,1166 1056.07,1169.07 1056.07,1181.52 1046.7,1190.9 U3.7@1046.7,1209 1046.7,1224.49 1050.21,1228 1096.92,1228 1105,1236.08 1105,1288.48 1091.73,1301.75 1069.91,1301.75 1066.4,1305.26 U3.3@1066.4,1321.4
VCC_2: R35.2 U7.3 U7.7 | length 240.8
  Bottom w6: R35.2@2411.14,1166 2408.07,1169.07 2408.07,1181.52 2398.7,1190.9 U7.7@2398.7,1209 2398.7,1224.49 2402.21,1228 2448.92,1228 2457,1236.08 2457,1288.48 2443.73,1301.75 2421.91,1301.75 2418.4,1305.26 U7.3@2418.4,1321.4
VCC_3: R52.2 U10.3 U10.7 | length 240.8
  Bottom w6: R52.2@3772.14,1166 3769.07,1169.07 3769.07,1181.52 3759.7,1190.9 U10.7@3759.7,1209 3759.7,1224.49 3763.21,1228 3809.92,1228 3818,1236.08 3818,1288.48 3804.73,1301.75 3782.91,1301.75 3779.4,1305.26 U10.3@3779.4,1321.4
VCC_4: R69.2 U13.3 U13.7 | length 240.8
  Bottom w6: R69.2@5094.14,1166 5091.07,1169.07 5091.07,1181.52 5081.7,1190.9 U13.7@5081.7,1209 5081.7,1224.49 5085.21,1228 5131.92,1228 5140,1236.08 5140,1288.48 5126.73,1301.75 5104.91,1301.75 5101.4,1305.26 U13.3@5101.4,1321.4
VCC_5: R86.2 U16.3 U16.7 | length 230.7
  Bottom w6: U16.3@2607,3835 2607,3851.14 2603.49,3854.65 2581.67,3854.65 2576.4,3859.92 2576.4,3922.48 2581.67,3927.75 2623.19,3927.75 2626.7,3931.26 U16.7@2626.7,3947.4 ; R86.2@2613.86,3990 2620.9,3982.96 2620.9,3971.1 2627,3965 U16.7@2627,3947.7
VCC_6: R103.2 U19.3 U19.7 | length 230.7
  Bottom w6: U19.3@4027,3843 4027,3859.14 4023.49,3862.65 4001.67,3862.65 3996.4,3867.92 3996.4,3930.48 4001.67,3935.75 4043.19,3935.75 4046.7,3939.26 U19.7@4046.7,3955.4 ; R103.2@4033.86,3998 4040.9,3990.96 4040.9,3979.1 4047,3973 U19.7@4047,3955.7
VCC_7: R120.2 U22.3 U22.7 | length 230.7
  Bottom w6: U22.3@5369,3840 5369,3856.14 5365.49,3859.65 5343.67,3859.65 5338.4,3864.92 5338.4,3927.48 5343.67,3932.75 5385.19,3932.75 5388.7,3936.26 U22.7@5388.7,3952.4 ; R120.2@5375.86,3995 5382.9,3987.96 5382.9,3976.1 5389,3970 U22.7@5389,3952.7
VCC_8: R137.2 U25.3 U25.7 | length 230.7
  Bottom w6: U25.3@1253,3837 1253,3853.14 1249.49,3856.65 1227.67,3856.65 1222.4,3861.92 1222.4,3924.48 1227.67,3929.75 1269.19,3929.75 1272.7,3933.26 U25.7@1272.7,3949.4 ; R137.2@1259.86,3992 1266.9,3984.96 1266.9,3973.1 1273,3967 U25.7@1273,3949.7
XTALA1: C8.2 U1.9 Y1.1 | length 158.3
  Bottom w6: U1.9@1590.46,1598.89 1626.11,1598.89 1661.08,1563.92 Y1.1@1687.33,1563.92 C8.2@1687.33,1516.95
XTALA2: C30.2 U5.9 Y2.1 | length 158.3
  Bottom w6: U5.9@2942.46,1598.89 2978.11,1598.89 3013.08,1563.92 Y2.1@3039.33,1563.92 C30.2@3039.33,1516.95
XTALA3: C46.2 U8.9 Y3.1 | length 158.3
  Bottom w6: U8.9@4303.46,1598.89 4339.11,1598.89 4374.08,1563.92 Y3.1@4400.33,1563.92 C46.2@4400.33,1516.95
XTALA4: C62.2 U11.9 Y4.1 | length 158.3
  Bottom w6: U11.9@5625.46,1598.89 5661.11,1598.89 5696.08,1563.92 Y4.1@5722.33,1563.92 C62.2@5722.33,1516.95
XTALA5: C78.2 U14.9 Y5.1 | length 168.6
  Bottom w6: C78.2@1961.71,3640 1961.71,3589.62 Y5.1@1961.67,3589.57 1991.43,3589.57 2026,3555 U14.9@2065.54,3555
XTALA6: C94.2 U17.9 Y6.1 | length 168.6
  Bottom w6: C94.2@3381.71,3648 3381.71,3597.62 Y6.1@3381.67,3597.57 3411.43,3597.57 3446,3563 U17.9@3485.54,3563
XTALA7: C110.2 U20.9 Y7.1 | length 168.6
  Bottom w6: C110.2@4723.71,3645 4723.71,3594.62 Y7.1@4723.67,3594.57 4753.43,3594.57 4788,3560 U20.9@4827.54,3560
XTALA8: C126.2 U23.9 Y8.1 | length 168.6
  Bottom w6: C126.2@607.71,3642 607.71,3591.62 Y8.1@607.67,3591.57 637.43,3591.57 672,3557 U23.9@711.54,3557
pads on no net: J1. J1.4 J1.7 J1.8 J1.9 J3.0 J3.6 J3.9 J4. J4.4 J4.7 J4.8 J4.9 J6.0 J6.6 J6.9 J7. J7.4 J7.7 J7.8 J7.9 J9.0 J9.6 J9.9 J10. J10.4 J10.7 J10.8 J10.9 J12.0 J12.6 J12.9 J13. J13.4 J13.7 J13.8 J13.9 J15.0 J15.6 J15.9 J16. J16.4 J16.7 J16.8 J16.9 J17.0 J17.6 J17.9 J18. J18.4 J18.7 J18.8 J18.9 J20.0 J20.6 J20.9 J21. J21.4 J21.7 J21.8 J21.9 J23.0 J23.6 J23.9 U1.1 U1.2 U1.3 U1.4 U1.10 U1.11 U1.12 U1.13 U1.14 U1.16 U1.17 U1.18 U1.19 U1.20 U1.21 U1.22 U1.27 U1.29 U1.34 U1.38 U1.39 U1.40 U1.41 U1.42 U1.43 U1.44 U1.45 U2.7 U2.8 U2.9 U2.10 U4.3 U4.8 U5.1 U5.2 U5.3 U5.4 U5.10 U5.11 U5.12 U5.13 U5.14 U5.16 U5.17 U5.18 U5.19 U5.20 U5.21 U5.22 U5.27 U5.29 U5.34 U5.38 U5.39 U5.40 U5.41 U5.42 U5.43 U5.44 U5.45 U6.7 U6.8 U6.9 U6.10 U8.1 U8.2 U8.3 U8.4 U8.10 U8.11 U8.12 U8.13 U8.14 U8.16 U8.17 U8.18 U8.19 U8.20 U8.21 U8.22 U8.27 U8.29 U8.34 U8.38 U8.39 U8.40 U8.41 U8.42 U8.43 U8.44 U8.45 U9.7 U9.8 U9.9 U9.10 U11.1 U11.2 U11.3 U11.4 U11.10 U11.11 U11.12 U11.13 U11.14 U11.16 U11.17 U11.18 U11.19 U11.20 U11.21 U11.22 U11.27 U11.29 U11.34 U11.38 U11.39 U11.40 U11.41 U11.42 U11.43 U11.44 U11.45 U12.7 U12.8 U12.9 U12.10 U14.1 U14.2 U14.3 U14.4 U14.10 U14.11 U14.12 U14.13 U14.14 U14.16 U14.17 U14.18 U14.19 U14.20 U14.21 U14.22 U14.27 U14.29 U14.34 U14.38 U14.39 U14.40 U14.41 U14.42 U14.43 U14.44 U14.45 U15.7 U15.8 U15.9 U15.10 U17.1 U17.2 U17.3 U17.4 U17.10 U17.11 U17.12 U17.13 U17.14 U17.16 U17.17 U17.18 U17.19 U17.20 U17.21 U17.22 U17.27 U17.29 U17.34 U17.38 U17.39 U17.40 U17.41 U17.42 U17.43 U17.44 U17.45 U18.7 U18.8 U18.9 U18.10 U20.1 U20.2 U20.3 U20.4 U20.10 U20.11 U20.12 U20.13 U20.14 U20.16 U20.17 U20.18 U20.19 U20.20 U20.21 U20.22 U20.27 U20.29 U20.34 U20.38 U20.39 U20.40 U20.41 U20.42 U20.43 U20.44 U20.45 U21.7 U21.8 U21.9 U21.10 U23.1 U23.2 U23.3 U23.4 U23.10 U23.11 U23.12 U23.13 U23.14 U23.16 U23.17 U23.18 U23.19 U23.20 U23.21 U23.22 U23.27 U23.29 U23.34 U23.38 U23.39 U23.40 U23.41 U23.42 U23.43 U23.44 U23.45 U24.7 U24.8 U24.9 U24.10

## Polygon pours and split planes (outlines as drawn)
GND on Top "GND_L01_P000" (solid, remove dead copper, pour order 0): -38.56,1.79 ccw(c39.66,-7.23) 39.66,-85.97 6260.13,-85.97 ccw(c6260.13,-7.23) 6338.87,-7.23 6338.87,5015.09 ccw(c6230.06,5045.17) 6260.13,5153.98 101.81,5153.98 ccw(c82,5071.68) 0.27,5093.73
GND on GND "GND_L03_P019" (solid, remove dead copper, pour order 19): -38.56,1.79 ccw(c39.66,-7.23) 39.66,-85.97 6260.13,-85.97 ccw(c6260.13,-7.23) 6338.87,-7.23 6338.87,5015.09 ccw(c6230.06,5045.17) 6260.13,5153.98 101.81,5153.98 ccw(c82,5071.68) 0.27,5093.73
GND on Bottom "GND_L04_P021" (solid, remove dead copper, pour order 21): -38.56,1.79 ccw(c39.66,-7.23) 39.66,-85.97 6260.13,-85.97 ccw(c6260.13,-7.23) 6338.87,-7.23 6338.87,5015.09 ccw(c6230.06,5045.17) 6260.13,5153.98 101.81,5153.98 ccw(c82,5071.68) 0.27,5093.73
VCC3V3 on PWR "VCC3V3_L02_P018" (solid, remove dead copper, pour order 18): -38.56,1.79 ccw(c39.66,-7.23) 39.66,-85.97 6260.13,-85.97 ccw(c6260.13,-7.23) 6338.87,-7.23 6338.87,5015.09 ccw(c6230.06,5045.17) 6260.13,5153.98 101.81,5153.98 ccw(c82,5071.68) 0.27,5093.73

## Keep-outs
Keep-Out Layer:
  lines w0.5: -0.85,2676.32 -0.85,77.89 ; -0.85,77.89 ccw(c77.89,77.89) 77.89,-0.85 6298.36,-0.85 ccw(c6298.36,77.89) 6377.1,77.89 6377.1,5077.89 ccw(c6298.36,5077.89) 6298.36,5156.63 77.89,5156.63 ccw(c77.89,5077.89) -0.85,5077.89 -0.85,77.89

## Other copper
Top:
  pour cut-out: 5344,3735 5551,3735 5551,3532 5344,3532
  pour cut-out: 4002,3738 4209,3738 4209,3535 4002,3535
  pour cut-out: 2582,3730 2789,3730 2789,3527 2582,3527
  pour cut-out: 4902,1626 5109,1626 5109,1423 4902,1423
  pour cut-out: 3580,1626 3787,1626 3787,1423 3580,1423
  pour cut-out: 2219,1626 2426,1626 2426,1423 2219,1423
  pour cut-out: 2581.87,3730 2788.87,3730 2788.87,3527 2581.87,3527
  pour cut-out: 4003,3738.5 4210,3738.5 4210,3535.5 4003,3535.5
  pour cut-out: 5344,3736 5551,3736 5551,3533 5344,3533
  pour cut-out: 4902,1627 5109,1627 5109,1424 4902,1424
  pour cut-out: 3591,1628 3798,1628 3798,1425 3591,1425
  pour cut-out: 2218.5,1627 2425.5,1627 2425.5,1424 2218.5,1424
  pour cut-out: 867,1626 1074,1626 1074,1423 867,1423
  pour cut-out: 1228,3732 1435,3732 1435,3529 1228,3529
  region net VCC3V3: 307.13,1981.1 319.13,1993.1 400.13,1993.1 421.13,1972.1 421.13,1875.1 408.13,1862.1 317.13,1862.1 306.13,1873.1
  region net VCC3V3: 292.13,1985.1 300.13,1993.1 338.13,1993.1 346.13,1985.1 346.13,1873.1 335.13,1862.1 296.13,1862.1 292.13,1866.1
  region net VCC5V_EXT: 105.13,589.1 131.13,615.1 243.13,615.1 295.13,667.1 295.13,919.32 298.91,923.1 306.91,915.1 427.13,915.1 427.13,882.1 435.13,874.1 435.13,663.1 434.13,662.1 434.13,570.1 335.13,471.1 129.13,471.1 105.13,495.1
  region net VCC5V_EXT: 295.13,874.1 295.13,1053.1 315.13,1073.1 415.13,1073.1 435.13,1053.1 435.13,874.1
  region net VCC5V: 395.13,1153.1 325.13,1153.1 315.13,1163.1 315.13,1403.1 325.13,1413.1 385.13,1413.1 395.13,1403.1 395.13,1163.1
  region net VCC5V: 335.16,1449.07 340.13,1444.1 340.13,1423.1 353.13,1410.1 353.13,1406.1 276.13,1406.1 266.13,1416.1 265.13,1416.1 263.13,1418.1 263.13,1442.1 271.13,1450.1
  region net VCC3V3_LDO: 282.13,1687.1 295.13,1700.1 295.13,1728.1 301.13,1734.1 339.13,1734.1 346.13,1727.1 346.13,1659.1 339.13,1652.1 287.13,1652.1 282.13,1657.1
  region net VCC3V3_LDO: 295.13,1836.1 298.13,1839.1 330.13,1839.1 333.13,1836.1 333.13,1739.1 339.63,1732.6 332.13,1725.1 295.13,1725.1
PWR:
  pour cut-out: 5344,3735 5551,3735 5551,3532 5344,3532
  pour cut-out: 4002,3738 4209,3738 4209,3535 4002,3535
  pour cut-out: 2582,3730 2789,3730 2789,3527 2582,3527
  pour cut-out: 4902,1626 5109,1626 5109,1423 4902,1423
  pour cut-out: 3580,1626 3787,1626 3787,1423 3580,1423
  pour cut-out: 2219,1626 2426,1626 2426,1423 2219,1423
  pour cut-out: 2581.87,3730 2788.87,3730 2788.87,3527 2581.87,3527
  pour cut-out: 4003,3738 4210,3738 4210,3535 4003,3535
  pour cut-out: 5344,3735 5551,3735 5551,3532 5344,3532
  pour cut-out: 4902,1628 5109,1628 5109,1425 4902,1425
  pour cut-out: 3591,1628 3798,1628 3798,1425 3591,1425
  pour cut-out: 2218,1627 2425,1627 2425,1424 2218,1424
  pour cut-out: 867,1626 1074,1626 1074,1423 867,1423
  pour cut-out: 1228,3732 1435,3732 1435,3529 1228,3529
GND:
  pour cut-out: 5344,3735 5551,3735 5551,3532 5344,3532
  pour cut-out: 4002,3738 4209,3738 4209,3535 4002,3535
  pour cut-out: 2582,3730 2789,3730 2789,3527 2582,3527
  pour cut-out: 4902,1626 5109,1626 5109,1423 4902,1423
  pour cut-out: 3580,1626 3787,1626 3787,1423 3580,1423
  pour cut-out: 2219,1626 2426,1626 2426,1423 2219,1423
  pour cut-out: 2581.87,3730 2788.87,3730 2788.87,3527 2581.87,3527
  pour cut-out: 4003,3739 4210,3739 4210,3536 4003,3536
  pour cut-out: 5344,3735 5551,3735 5551,3532 5344,3532
  pour cut-out: 4902,1627 5109,1627 5109,1424 4902,1424
  pour cut-out: 3591,1628 3798,1628 3798,1425 3591,1425
  pour cut-out: 2218,1627 2425,1627 2425,1424 2218,1424
  pour cut-out: 867,1626 1074,1626 1074,1423 867,1423
  pour cut-out: 1228,3732 1435,3732 1435,3529 1228,3529
Bottom:
  pour cut-out: 5344,3735 5551,3735 5551,3532 5344,3532
  pour cut-out: 4002,3738 4209,3738 4209,3535 4002,3535
  pour cut-out: 2582,3730 2789,3730 2789,3527 2582,3527
  pour cut-out: 4902,1626 5109,1626 5109,1423 4902,1423
  pour cut-out: 3580,1626 3787,1626 3787,1423 3580,1423
  pour cut-out: 2219,1626 2426,1626 2426,1423 2219,1423
  pour cut-out: 867,1626 1074,1626 1074,1423 867,1423
  pour cut-out: 2581.87,3730 2788.87,3730 2788.87,3527 2581.87,3527
  pour cut-out: 4003,3739 4210,3739 4210,3536 4003,3536
  pour cut-out: 5343,3735 5550,3735 5550,3532 5343,3532
  pour cut-out: 4901,1627 5108,1627 5108,1424 4901,1424
  pour cut-out: 3591.5,1628 3798.5,1628 3798.5,1425 3591.5,1425
  pour cut-out: 2218,1628 2425,1628 2425,1425 2218,1425
  pour cut-out: 1228,3732 1435,3732 1435,3529 1228,3529

## Silkscreen, mask and mechanical layers (free items; w line width, h text height)
Top Overlay:
  lines w78.74: 929,2599 1884,2599 1984,2599 ; 1841.5,2741.5 1984,2599 ; 1863.96,2466.32 1984,2599
  text "GND" at 3370.11,3019.71 h30
  text "GND" at 3370.11,3019.71 h30
  text "GND" at 4712.11,3016.71 h30
  text "GND" at 596.11,3013.71 h30
  text "GND" at 1950.11,3011.71 h30
  text "Top" at 1337,2679.99 h60
  text "GND" at 2976.59,1969.08 h30
  text "GND" at 1612.71,1965 h30
  text "GND" at 4347.34,1952.29 h30
  text "GND" at 5658.46,1952.29 h30
  text "3V3" at 436,1903 h30
Bottom Overlay:
  lines w3.94: 4676,2243.24 4676,2951.91 5456,2951.91 5456,2243.24 4676,2243.24
  lines w78.74: 929,2599 1884,2599 1984,2599 ; 1841.5,2741.5 1984,2599 ; 1863.96,2466.32 1984,2599
  text "Bottom" at 1542,2658 h60
Mechanical 1:
  lines w0.5: 0.15,2676.32 0.15,77.89 ; 0.15,77.89 ccw(c78.89,77.89) 78.89,-0.85 6299.36,-0.85 ccw(c6299.36,77.89) 6378.1,77.89 6378.1,5077.89 ccw(c6299.36,5077.89) 6299.36,5156.63 78.89,5156.63 ccw(c78.89,5077.89) 0.15,5077.89 0.15,77.89
Mechanical 2:
  circle w0.5: c6182.25,2558.2 r59.06
  circle w0.5: c6182.25,196 r59.06
  circle w0.5: c198,196 r59.06
  circle w0.5: c198,2558.2 r59.06
  lines w0.5: 1.15,196 186.19,196 ; 1.15,2558.2 186.19,2558.2 ; 192.09,196 203.91,196 ; 192.09,2558.2 203.91,2558.2 ; 198,-0.85 198,184.19 ; 198,190.09 198,201.91 ; 198,207.81 198,392.85 ; 198,2361.35 198,2546.39 ; 198,2552.3 198,2564.11 ; 209.81,196 394.85,196 ; 209.81,2558.2 394.85,2558.2 ; 4160.06,1961.34 ccw(c4178.37,2000.58) 4196.69,2039.83 ; 5985.4,196 6170.44,196 ; 5985.4,2558.2 6170.44,2558.2 ; 6176.35,196 6188.16,196 ; 6176.35,2558.2 6188.16,2558.2 ; 6182.25,-0.85 6182.25,184.19 ; 6182.25,190.09 6182.25,201.91 ; 6182.25,207.81 6182.25,392.85 ; 6182.25,2361.35 6182.25,2546.39 ; 6182.25,2552.3 6182.25,2564.11 ; 6182.25,2570.02 6182.25,2755.06 ; 6194.06,196 6379.1,196 ; 6194.06,2558.2 6379.1,2558.2

## Text inside footprints (layer, text, board x,y; h text height)
J1: Top Overlay "6" at 1377.35,139.56 h30 r180; Top Overlay "9" at 1050.57,139.56 h30 r180; Top Overlay "5" at 989.94,436.02 h30 r180; Top Overlay "1" at 1430.89,436.02 h30 r180
J4: Top Overlay "6" at 2721.35,139.56 h30 r180; Top Overlay "9" at 2394.57,139.56 h30 r180; Top Overlay "5" at 2333.94,436.02 h30 r180; Top Overlay "1" at 2774.89,436.02 h30 r180
J7: Top Overlay "1" at 4118.89,436.02 h30 r180; Top Overlay "5" at 3677.94,436.02 h30 r180; Top Overlay "9" at 3738.57,139.56 h30 r180; Top Overlay "6" at 4065.35,139.56 h30 r180
J10: Top Overlay "6" at 5409.35,139.56 h30 r180; Top Overlay "9" at 5082.57,139.56 h30 r180; Top Overlay "5" at 5021.94,436.02 h30 r180; Top Overlay "1" at 5462.89,436.02 h30 r180
J13: Top Overlay "1" at 2203.24,4727.09 h30; Top Overlay "5" at 2644.18,4727.09 h30; Top Overlay "9" at 2583.55,5023.54 h30; Top Overlay "6" at 2256.78,5023.54 h30
J16: Top Overlay "6" at 3605.91,5026.65 h30; Top Overlay "9" at 3932.68,5026.65 h30; Top Overlay "5" at 3993.31,4730.19 h30; Top Overlay "1" at 3552.36,4730.19 h30
J18: Top Overlay "6" at 4947.78,5027.54 h30; Top Overlay "9" at 5274.55,5027.54 h30; Top Overlay "5" at 5335.18,4731.09 h30; Top Overlay "1" at 4894.24,4731.09 h30
J21: Top Overlay "1" at 856.24,4725.09 h30; Top Overlay "5" at 1297.18,4725.09 h30; Top Overlay "9" at 1236.55,5021.54 h30; Top Overlay "6" at 909.78,5021.54 h30